# Altium PCB PCB2.PcbDoc
Units mil, origin at the board's own origin, x right, y up, seen from the top; angles counter-clockwise.
Board outline 2368.83 x 2207.33 mil, 2 copper layers (Top Layer, Bottom Layer); 4 components, 4 nets, 33 pads, 0 vias.
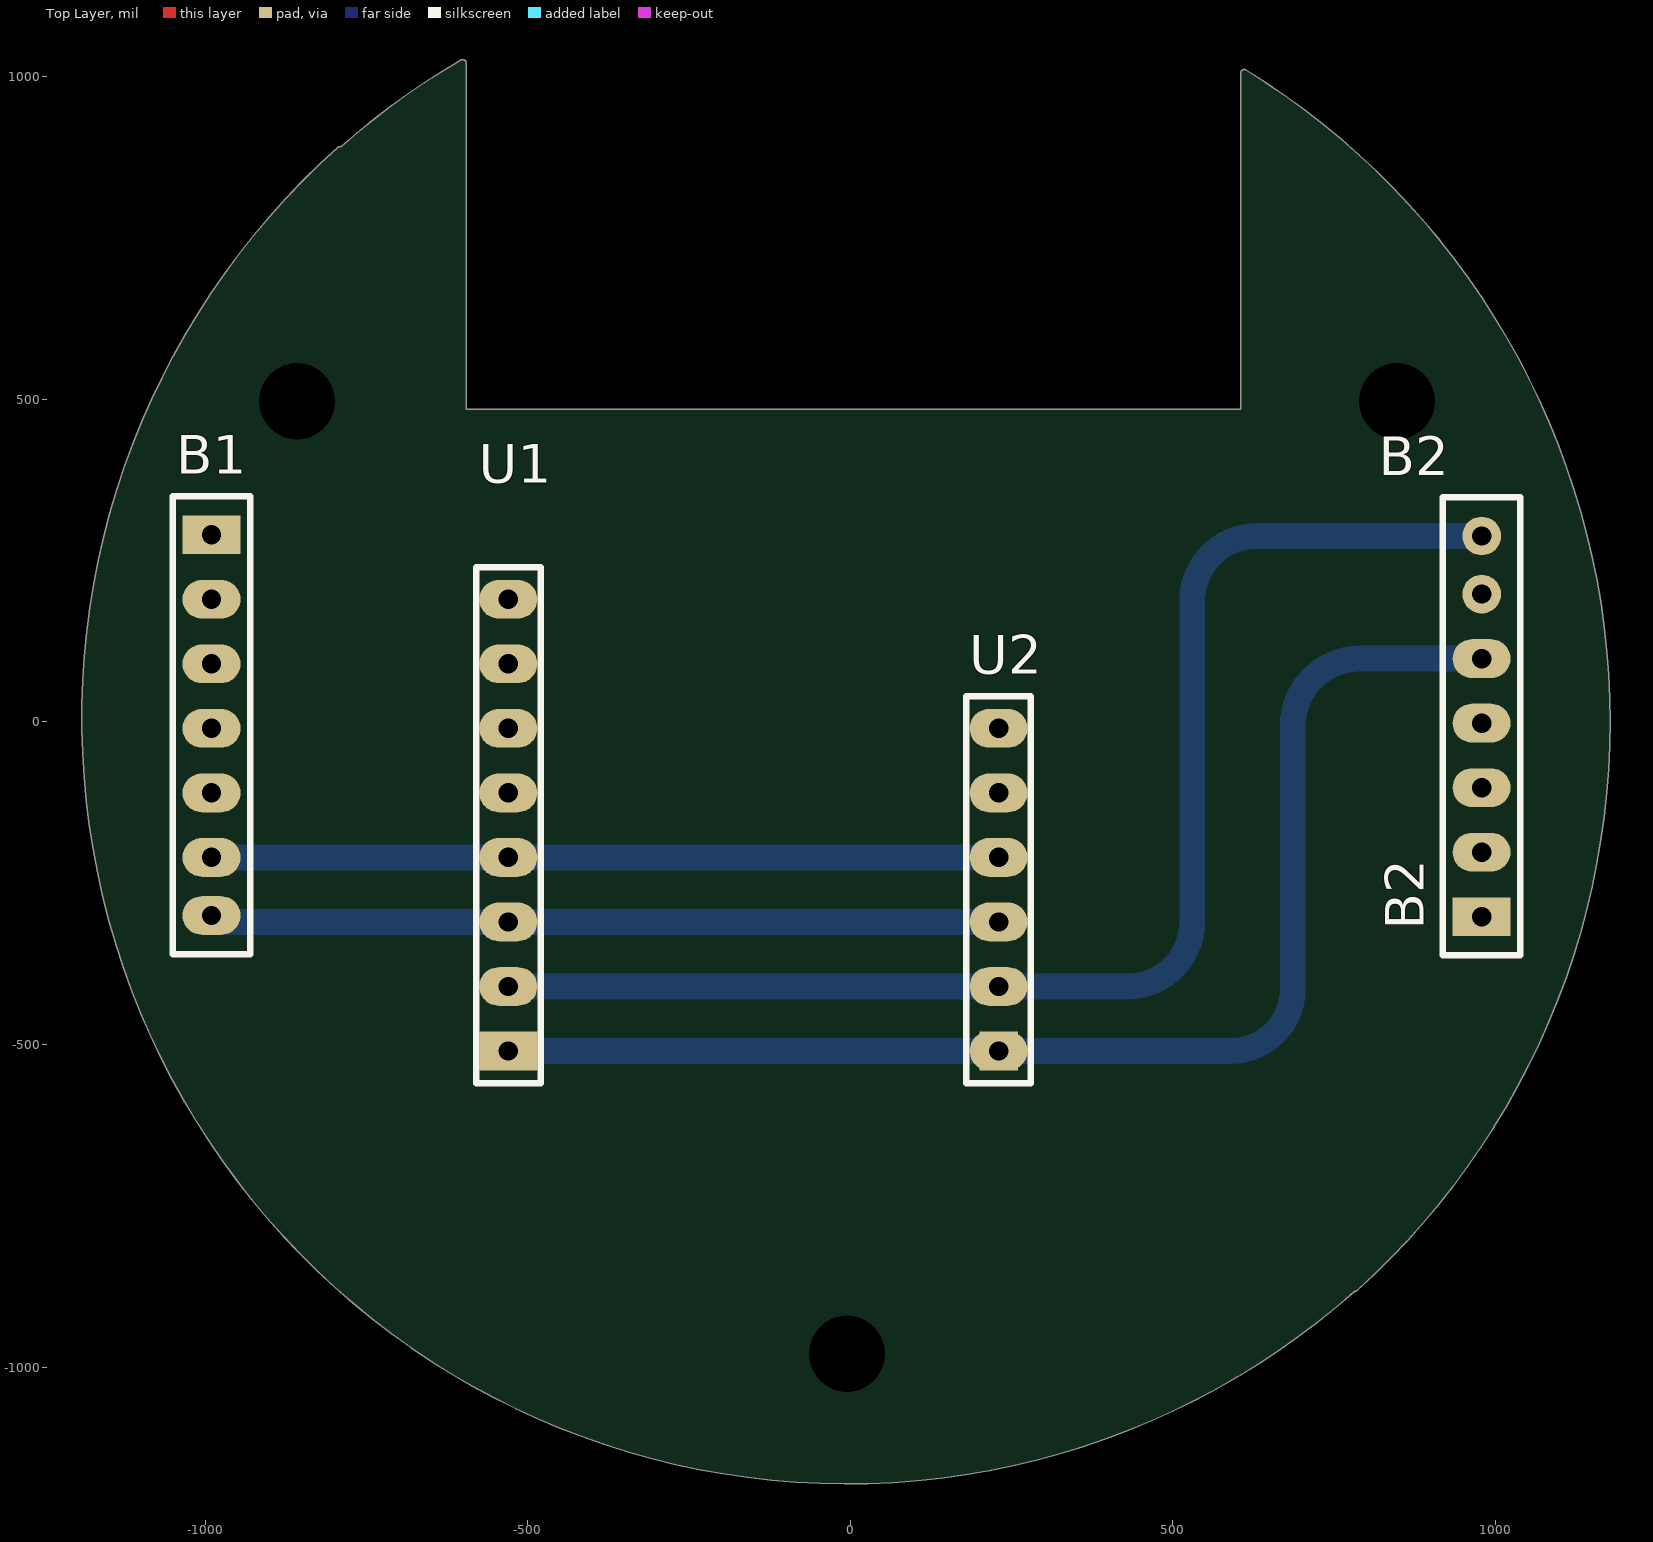
[diagram p0: Top Layer view]
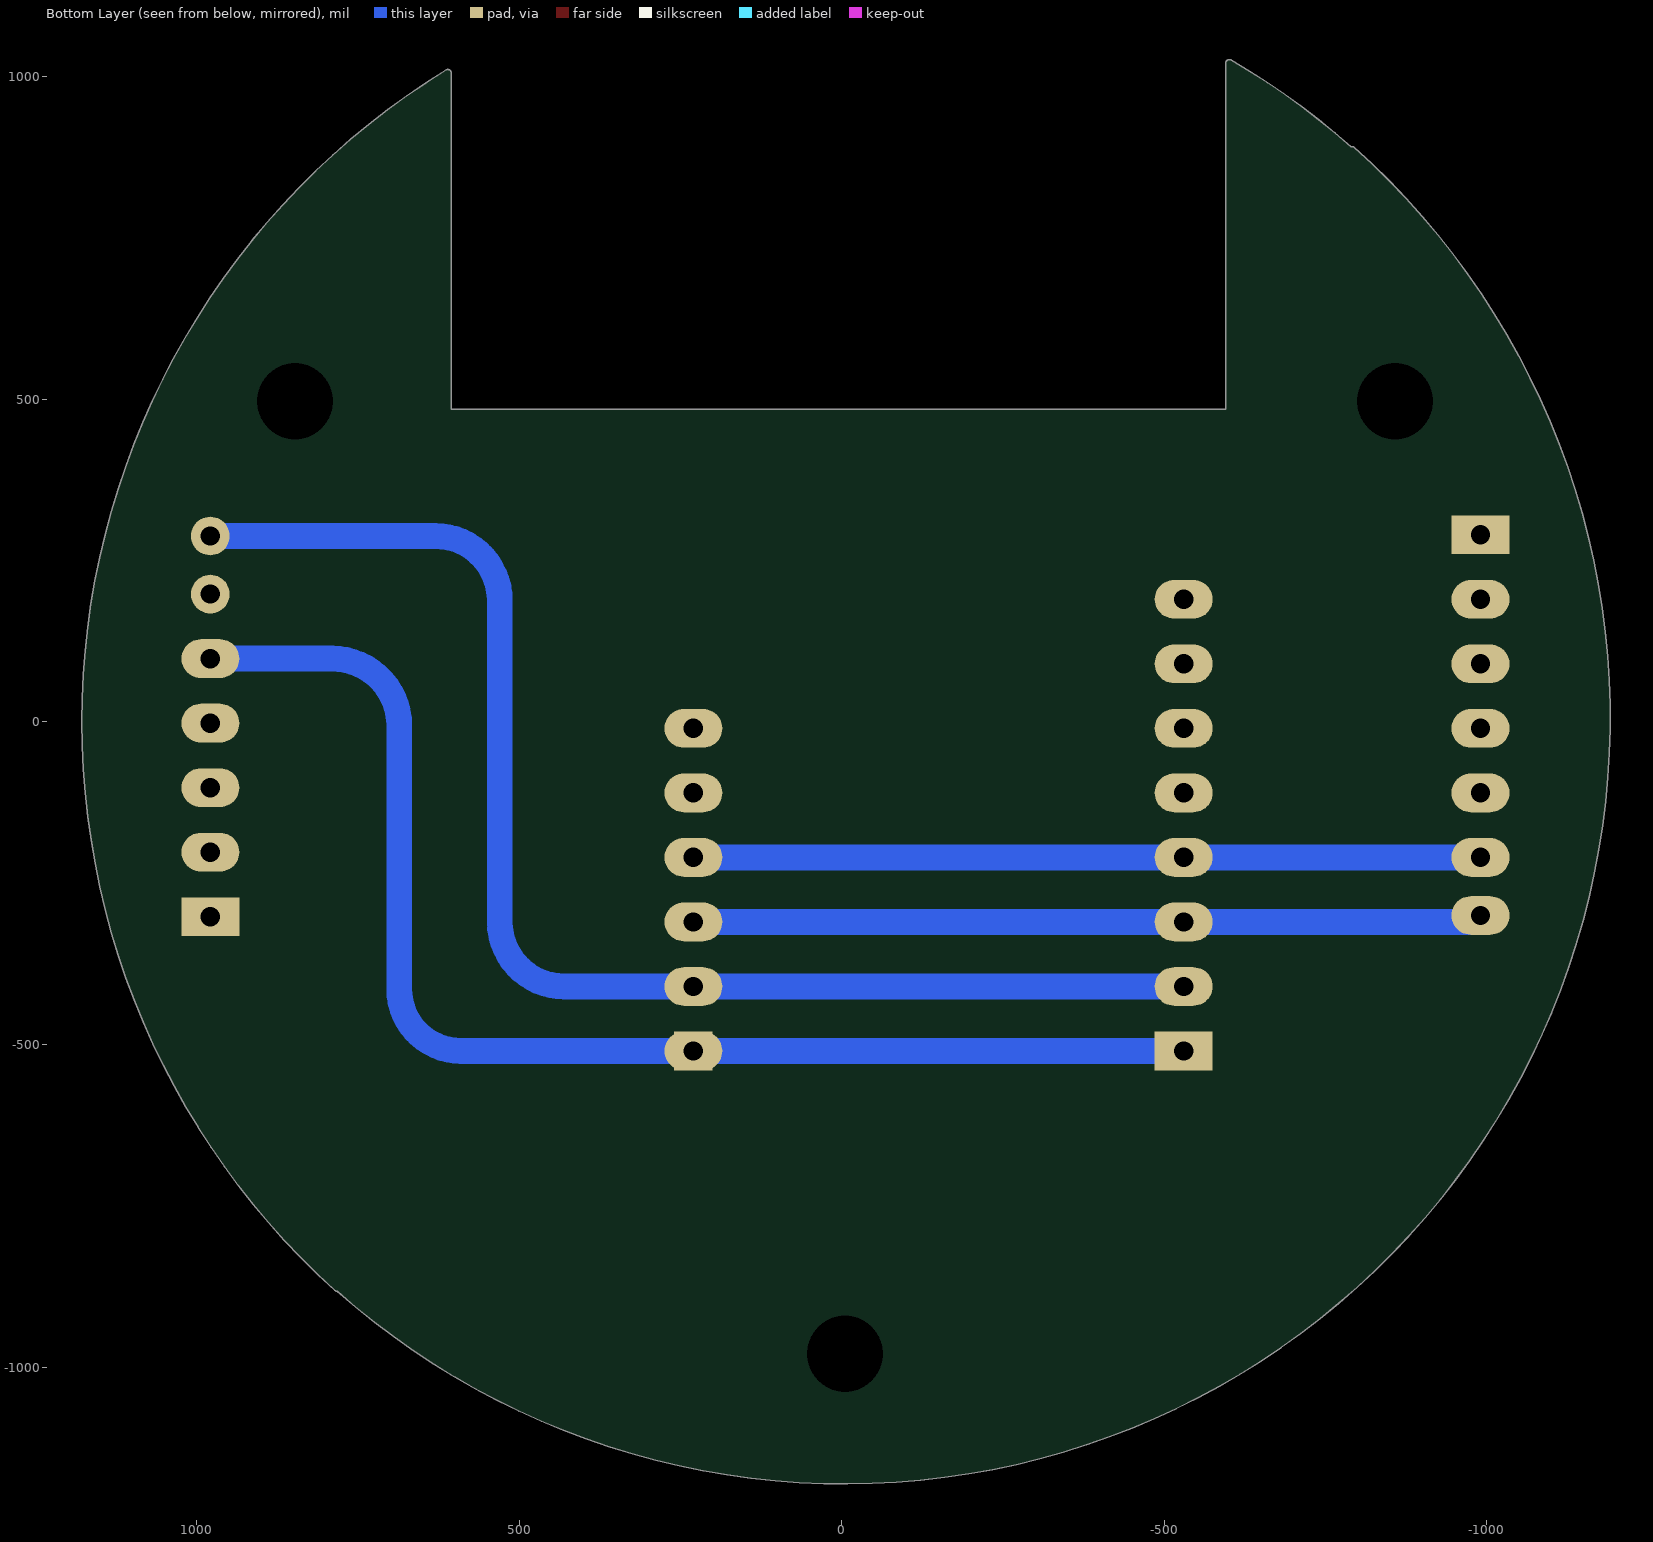
[diagram p1: Bottom Layer view, seen from below]
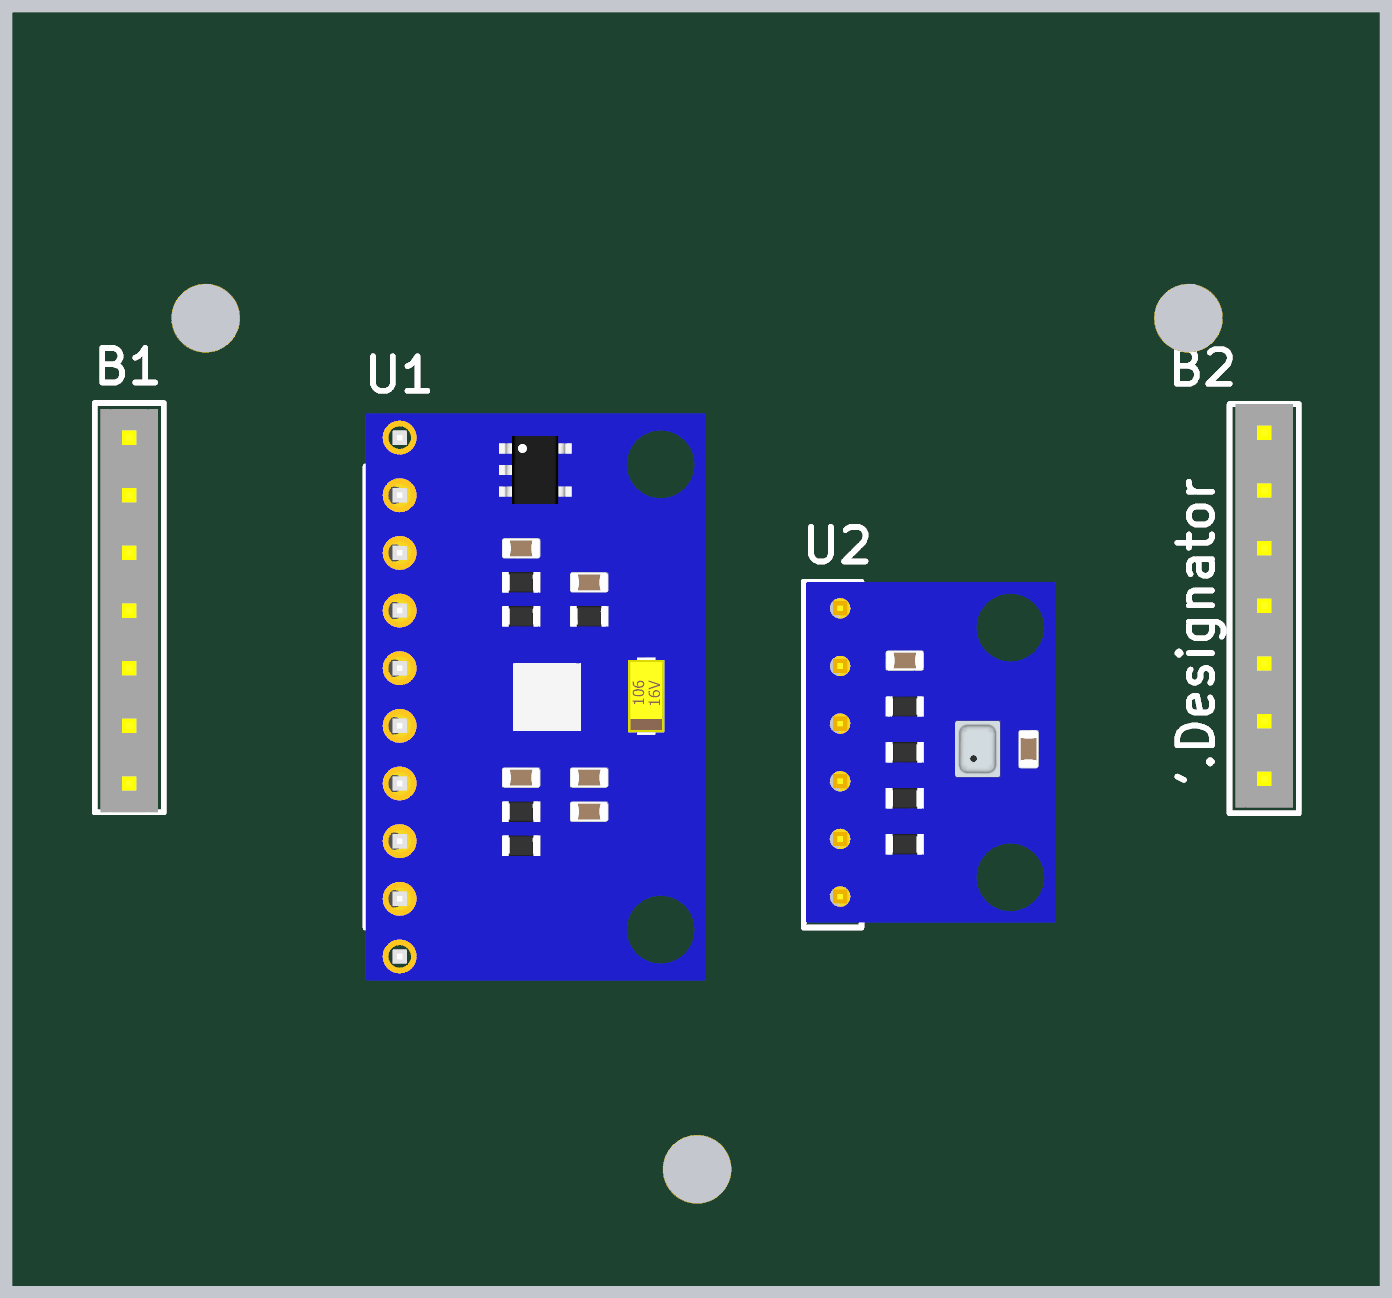
[diagram p2: 3D render of the assembled board from above, using the file's embedded part models]

## Layer stack, top to bottom
Top Solder: solder mask 0.4, Solder Resist, Dk 3.5
Top Layer: signal copper 1.4
Dielectric 1: dielectric 12.6, FR-4, Dk 4.8
Bottom Layer: signal copper 1.4
Bottom Solder: solder mask 0.4, Solder Resist, Dk 3.5

## Board outline
-794.1,890.55 cw(c-790.76,886.81) -789.47,891.65 cw(c-5,2) -604.38,1025.53 cw(c-601.85,1021.2) -600.92,1026.13 cw(c-600,1021.2) -594.99,1021.2 -594.99,485.02 604.98,485.02 604.98,1005.52 cw(c610,1005.52) 605.99,1008.53 cw(c610.48,1006.3) 613.11,1010.57 cw(c-8.3,0.27) 1177.81,0.27 cw(c-8.3,0.27) 785.47,-881.09 cw(c782.12,-877.37) 782.04,-882.38 cw(c-5,5)

## Design rules (kind name [scope] priority, off if disabled: settings)
Clearance [All] p1: gap=15 ignorepadtopadclearanceinfootprint=FALSE
PolygonConnect [All] p1: connectstyle=Relief reliefconductorwidth=10 reliefentries=4 polygonreliefangle="90 Angle" airgapwidth=10
RoutingVias [All] p1: holewidth=28 width=50 viastyle="Through Hole" minholewidth=28 minwidth=50 maxholewidth=28 maxwidth=50
SolderMaskExpansion [All] p1: expansion=4 istentingtop=FALSE
Width [All] p1: maxlimit=45 minlimit=35 preferedwidth=40
30 further rules are at their usual default settings.

## Components (designator, comment, footprint, x,y, rotation, side; value= is the part's Value field where it differs from the comment)
B1 "LEFT BUS" "bus right" -990,290 r270 top
B2 "RIGHT BUS" "bus left" 978.62,-301.81 r90 top
U1 "MPU9250" "MPU 9250" -530,-510 r90 top
U2 "BMP 280" "BMP 280" 230,-510 r90 top

## Footprints (in the part's own frame and the unit in brackets; to place one, negate y for a bottom-side part, rotate by r counter-clockwise, add the part's x,y. Pads: shape width x height; smd on the part's side, far side on the other; paste and mask are expansions set on the pad)
"BMP 280" [mil]
  rect 60x60 hole 30: 1(0,0)
  oval 60x90 hole 30: 1(0,0) 2(100,0) 3(200,0) 4(300,0) 5(400,0) 6(500,0)
  silkscreen extent -50,-50 550,50, body extent -46,-387 554,46, height 127
"bus left" [mil]
  rect 60x90 hole 30: 1(0,0)
  oval 60x90 hole 30: 2(100,0) 3(200,0) 4(300,0) 5(400,0)
  round 60 hole 30: 6(500,0) 7(590,0)
  silkscreen extent -60,-60 650,60, body extent -50,-50 650,50, height 621
"bus right" [mil]
  rect 60x90 hole 30: 1(0,0)
  oval 60x90 hole 30: 2(100,0) 3(200,0) 4(300,0) 5(400,0) 6(500,0) 7(590,0)
  silkscreen extent -60,-60 650,60, body extent -50,-50 650,50, height 621
"MPU 9250" [mil]
  round 60 hole 30: 1(0,0)
  rect 60x90 hole 30: 1(0,0)
  oval 60x90 hole 30: 2(100,0) 3(200,0) 4(300,0) 5(400,0) 6(500,0) 7(600,0) 8(700,0)
  silkscreen extent -50,-50 750,50, body extent -150,-541 850,50, height 129

## Part data
B1: library part "BUS left"
B2: library part "BUS right"

## Free pads (board coordinates)
  round 0 hole 118.11: 10(-857.39,497.13) 10(-5,-979.25) 10(847.39,497.13)

## Nets (pads, with @x,y where several pads share a name; then routed paths per layer and width w, separated by ;. In a path a pad name is that pad's centre, name@x,y a point inside that pad or via, vN(x,y) a via of type N, cw(c..) or ccw(c..) an arc to the next point about the centre after c; other vN are vias at no path point)
NetB1_6: B1.6 U1.4 U2.4 | length 1220
  Bottom Layer w40: B1.6 U1.4 U2.4
NetB1_7: B1.7 U1.3 U2.3 | length 1225.7
  Bottom Layer w40: B1.7 ccw(c-980,-300) -980,-310 U1.3 U2.3
NetB2_5: B2.5 U1.1 U2.1 | length 2031
  Bottom Layer w40: U1.1@-530,-510 230,-510 590,-510 ccw(c590,-414.18) 685.82,-414.18 685.82,-5.99 cw(c790,-5.99) 790,98.19 B2.5
NetB2_7: B2.7 U1.2 U2.2 | length 2121
  Bottom Layer w40: U1.2 U2.2 430,-410 ccw(c430,-310) 530,-310 530,188.19 cw(c630,188.19) 630,288.19 B2.7
pads on no net: B1.1 B1.2 B1.3 B1.4 B1.5 B2.1 B2.2 B2.3 B2.4 B2.6 U1.5 U1.6 U1.7 U1.8 U2.5 U2.6

## Silkscreen, mask and mechanical layers (free items; w line width, h text height)
Mechanical 1:
  lines w10: -790.76,886.81 ccw(c-5,5) 781.23,-876.38 ; -788.88,885.48 cw(c-5,2) -601.85,1021.2 ; -600,1021.2 -600,480 610,480 610,1005.52 ; 610.48,1006.3 cw(c-8.3,0.27) 782.12,-877.37
Mechanical 13:
  lines w10: -600.11,780.14 ccw(c0,0) 611.18,771.5